# Altium PCB CGM.PcbDoc
Units mil, origin at the board's own origin, x right, y up, seen from the top; angles counter-clockwise.
Board outline 1027.6 x 1027.6 mil, 4 copper layers (Top Layer 1, GND, MID, Bottom Layer 1), stack 17.019 mil thick; 36 components, 37 nets, 136 pads, 54 vias.
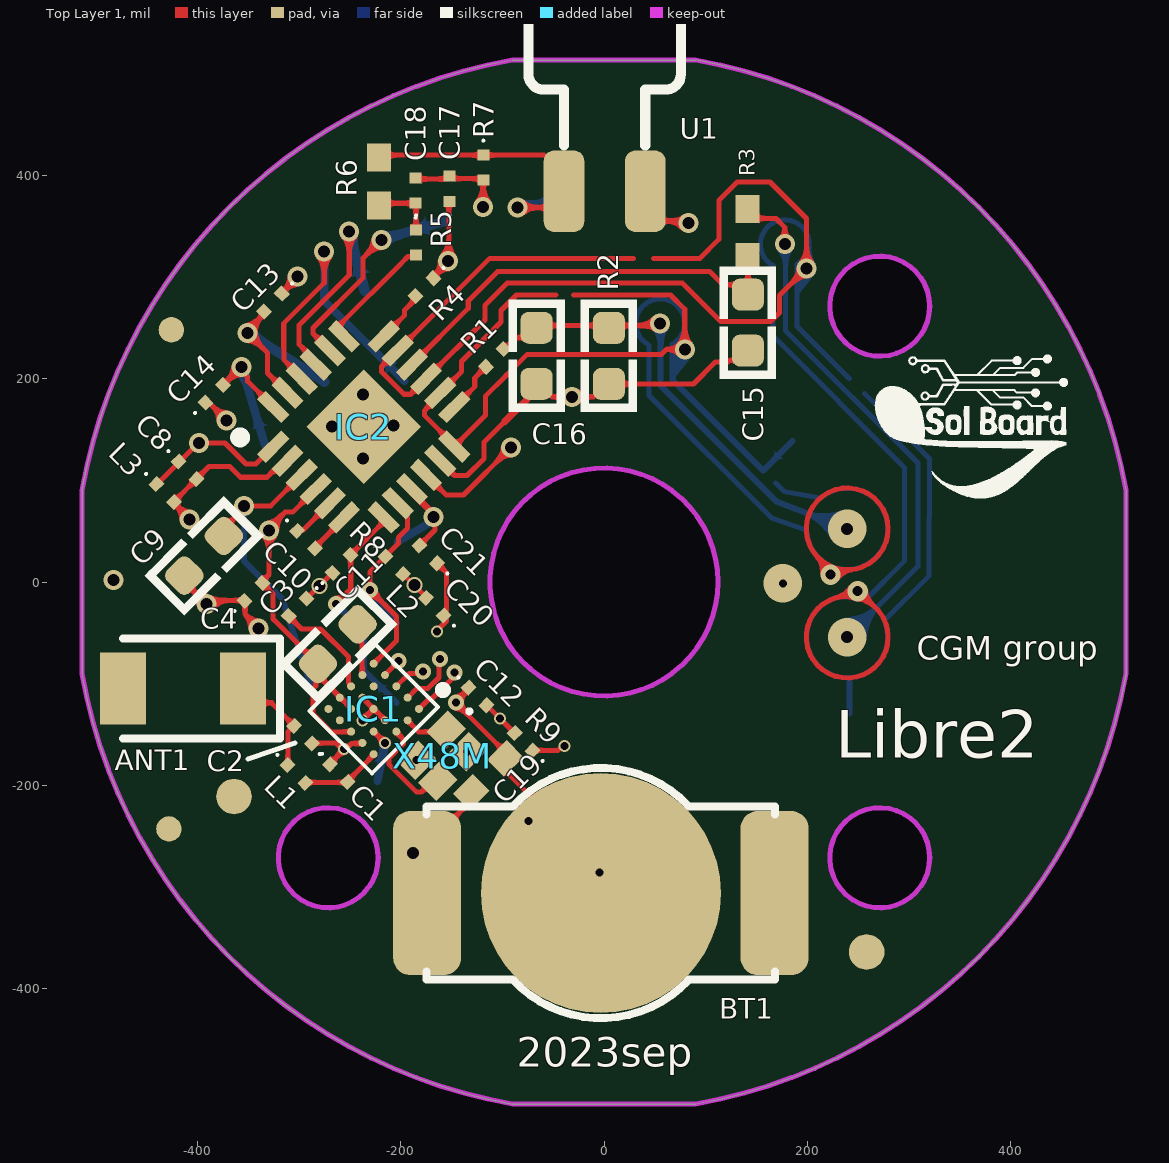
[diagram p0: Top Layer 1 view]
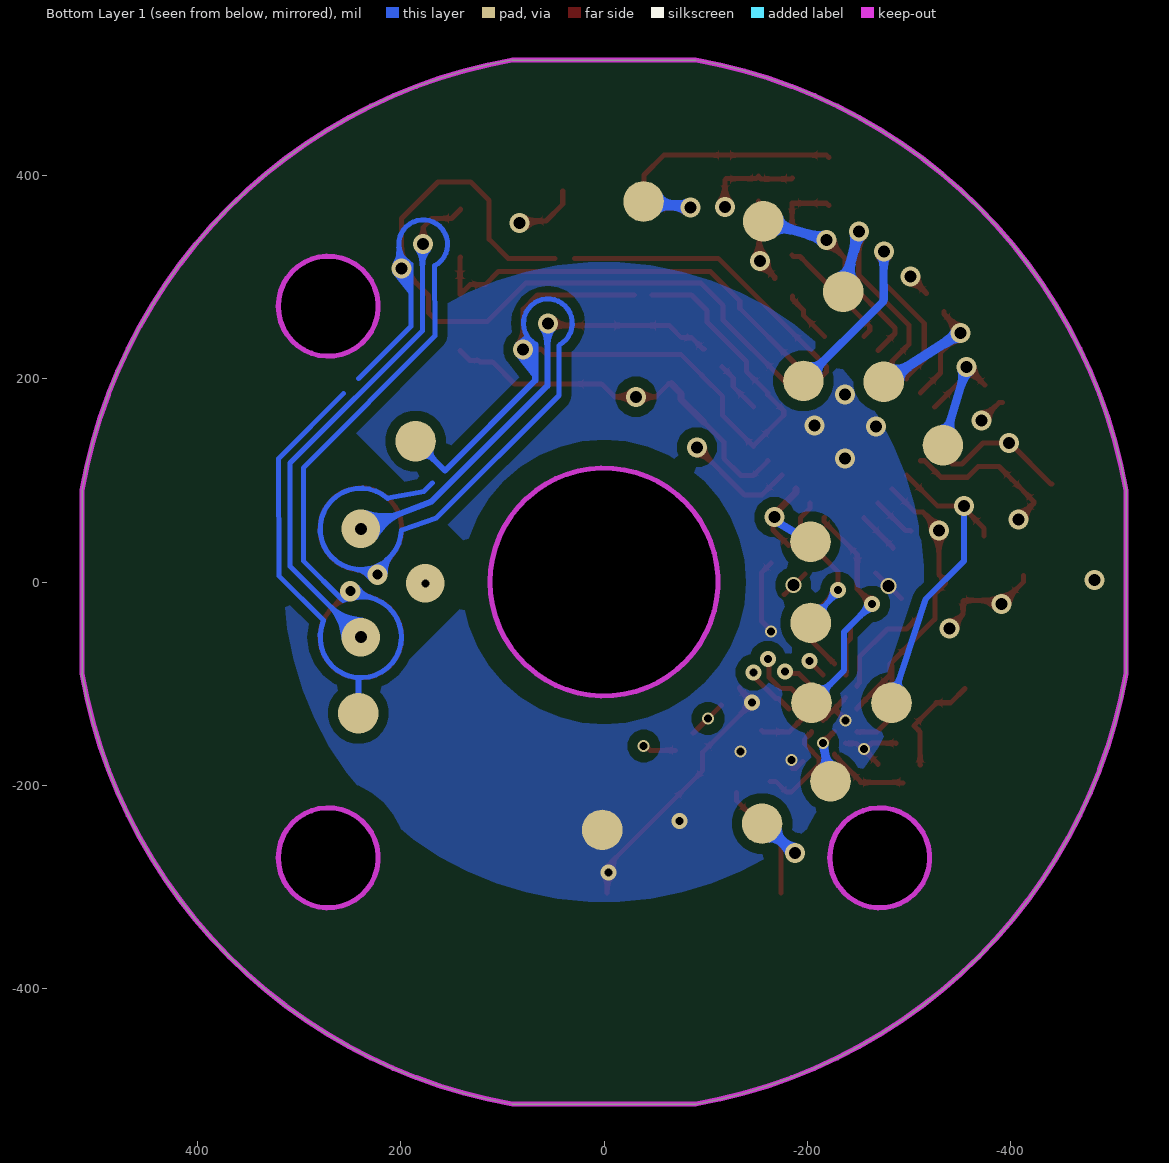
[diagram p1: Bottom Layer 1 view, seen from below]
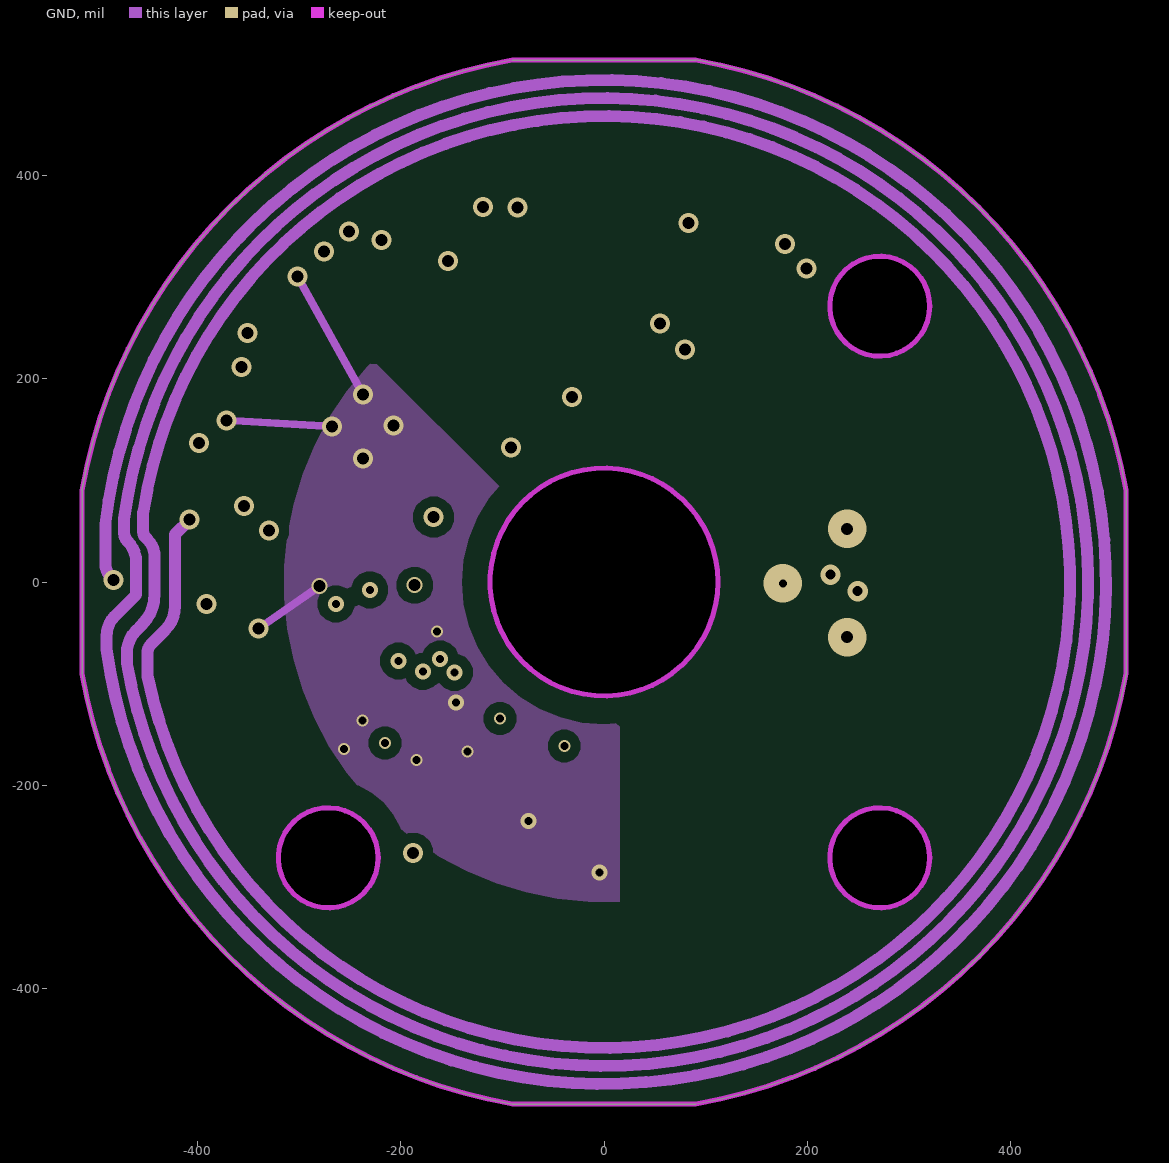
[diagram p2: GND]
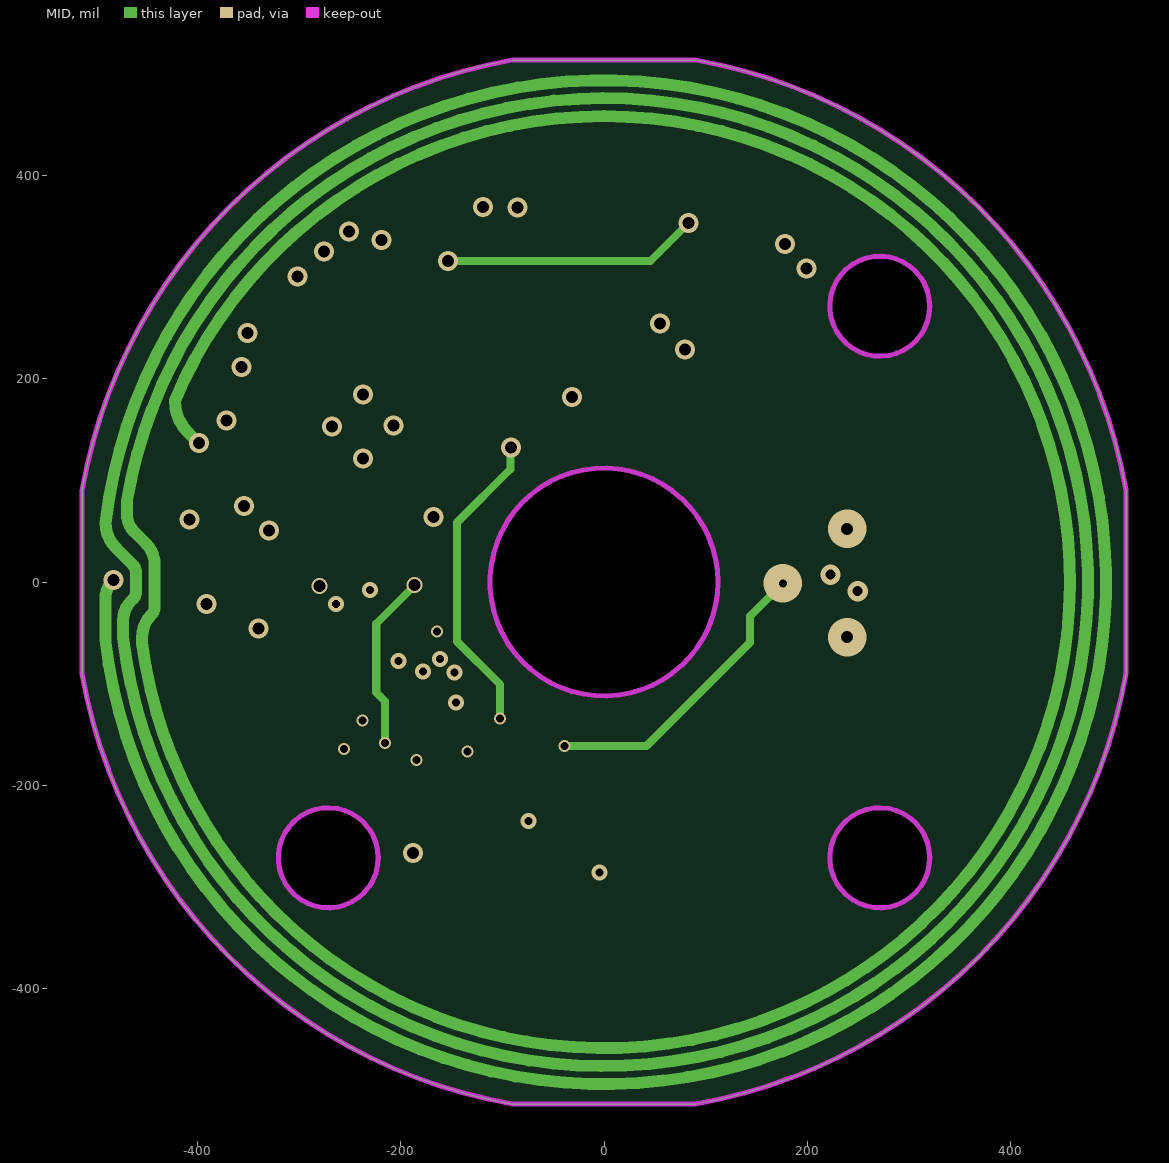
[diagram p3: MID]
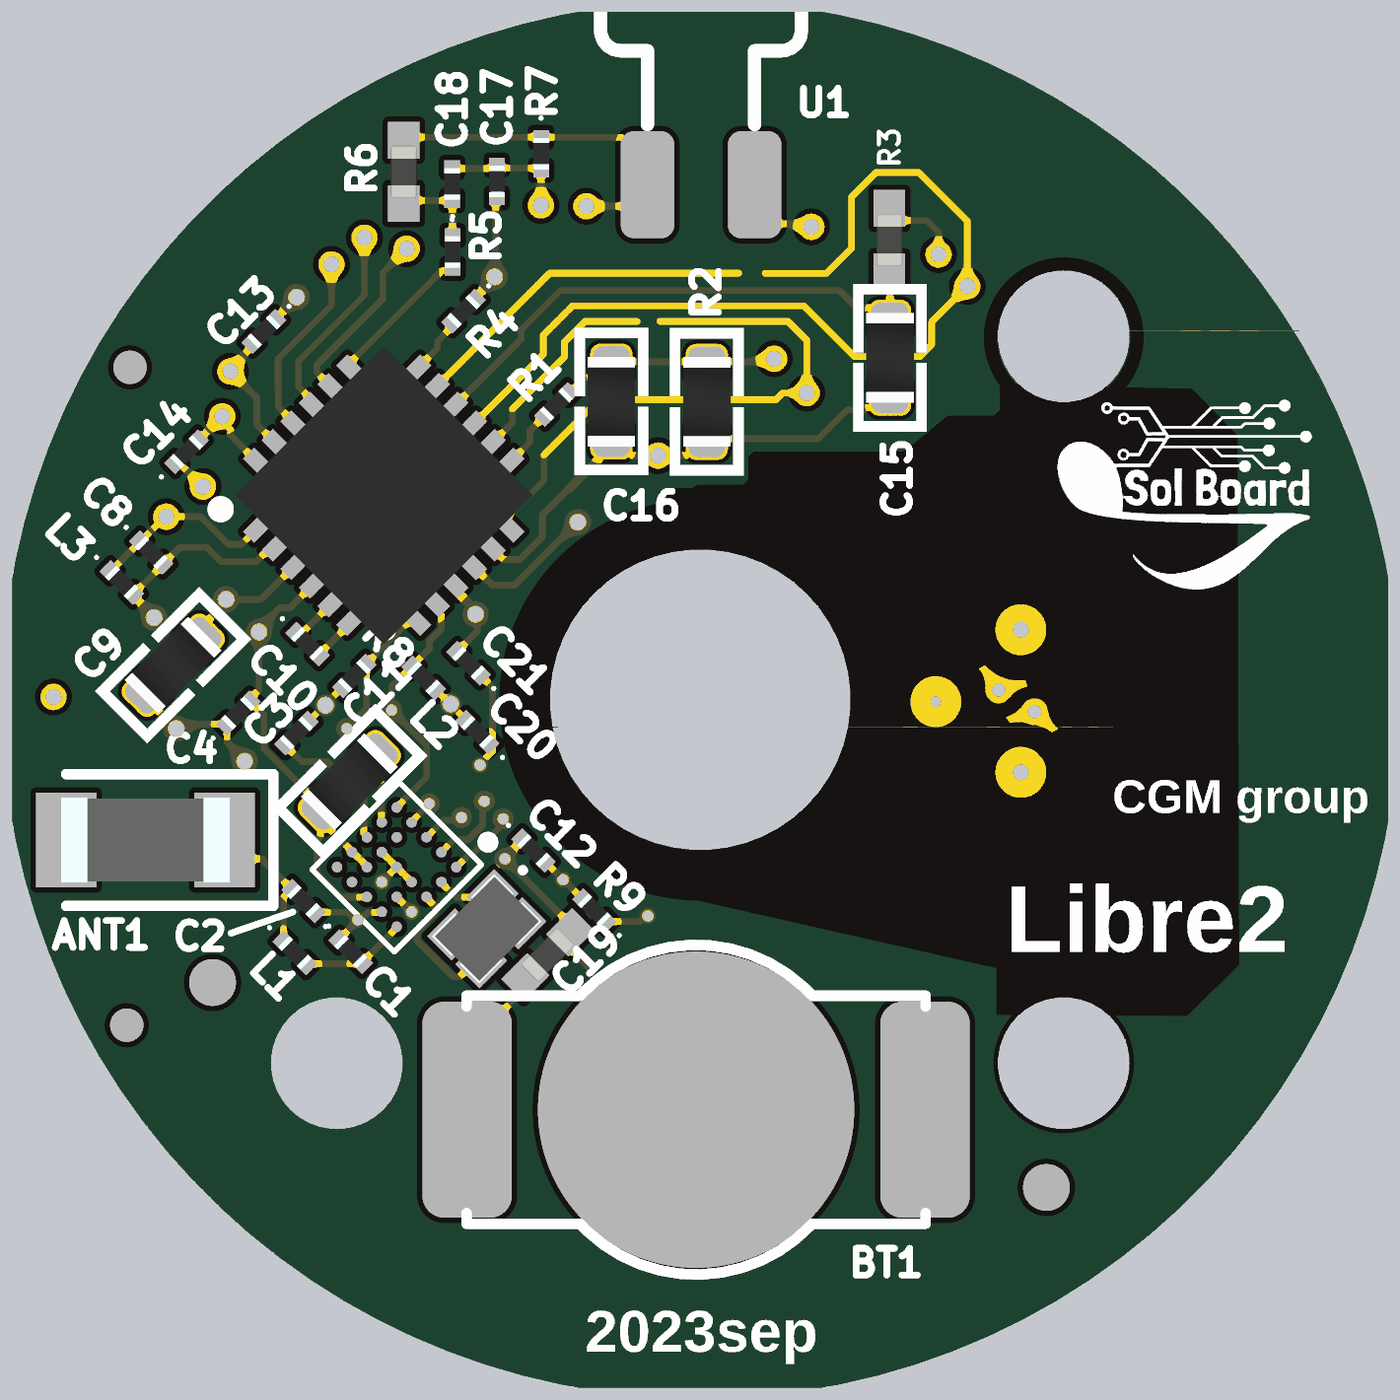
[diagram p4: 3D render of the assembled board from above, using the file's embedded part models]

## Layer stack, top to bottom
Top Solder: solder mask 0.4, Solder Resist, Dk 3.5
Top Layer 1: signal copper 0.689
Dielectric 2: prepreg 2.8, PP-006, Dk 4.1
GND: signal copper 0.689
Dielectric 1: dielectric 8.663, FR-4, Dk 4.8
MID: signal copper 0.689
Dielectric 3: prepreg 2.8, PP-006, Dk 4.1
Bottom Layer 1: signal copper 0.689
Bottom Solder: solder mask 0.4, Solder Resist, Dk 3.5

## Board outline
-513.78,-90.23 -513.78,90.1 -513.8,90.11 cw(c0,0) -90.23,513.78 90.1,513.78 90.11,513.8 cw(c0,0) 513.78,90.23 513.78,-90.1 513.8,-90.11 cw(c0,0) 90.23,-513.78 -90.1,-513.78 -90.11,-513.8 cw(c0,0)
cut-out: -320.64,-271.43 ccw(c-271.43,-271.43) -271.43,-320.64 ccw(c-271.43,-271.43) -222.22,-271.43 ccw(c-271.43,-271.43) -271.43,-222.22 ccw(c-271.43,-271.43)
cut-out: 222.22,-271.43 ccw(c271.43,-271.43) 271.43,-320.64 ccw(c271.43,-271.43) 320.64,-271.43 ccw(c271.43,-271.43) 271.43,-222.22 ccw(c271.43,-271.43)
cut-out: 222.22,271.43 ccw(c271.43,271.43) 271.43,222.22 ccw(c271.43,271.43) 320.64,271.43 ccw(c271.43,271.43) 271.43,320.64 ccw(c271.43,271.43)
cut-out: -112.2,0 ccw(c0,0) 0,-112.2 ccw(c0,0) 112.2,0 ccw(c0,0) 0,112.2 ccw(c0,0)

## Design rules (kind name [scope] priority, off if disabled: settings)
Clearance Clearance_IC2 [All vs InComponent('IC2')] p1: gap=5 ignorepadtopadclearanceinfootprint=FALSE
Clearance Clearance_KEEPOUT [All vs OnLayer('Keep-Out Layer')] p2: gap=25 ignorepadtopadclearanceinfootprint=FALSE
Clearance [All] p3: gap=10 ignorepadtopadclearanceinfootprint=FALSE
PolygonConnect [All] p1: connectstyle=Direct reliefconductorwidth=10 reliefentries=4 polygonreliefangle="90 Angle" airgapwidth=10
RoutingVias [All] p1: holewidth=28 width=50 viastyle="Through Hole" minholewidth=28 minwidth=50 maxholewidth=28 maxwidth=50
SolderMaskExpansion [All] p1: expansion=4 istentingtop=FALSE
SupplyNets "Schematic Supply Nets_1" [InNet('GND')] p1: voltage=0.000
SupplyNets "Schematic Supply Nets" [InNet('VBAT3')] p2: voltage=0.000
Width [All] p1: maxlimit=15 minlimit=3 preferedwidth=5
30 further rules are at their usual default settings.

## Components (designator, comment, footprint, x,y, rotation, side; value= is the part's Value field where it differs from the comment)
ANT1 "AMCA31-2R450G-S1F-T" ANTC3216X140N -414.37,-104.74 r180 top net-tie
BT1 "BAT3.0v" BTH -3.11,-306.14 r0 top
C1 "Cap" 0201 -261.01,-188.17 r315 top value=1.6pF
C2 "Cap" 0201 -296.25,-150.25 r135 top value=1.4pF
C3 "Cap" 0201 -301.56,-24.88 r225 top value=2.2uF
C4 "Cap" 0201 -345.02,-9.8 r45 top value=100nF
C8 "Cap" 0201 -409.92,109.93 r315 top value=8.2pF
C9 "Cap" ESD0603 -393.58,25.82 r225 top value=2.2uF
C10 "Cap" 0201 -293.25,41.65 r315 top value=10nF
C11 "Cap" 0201 -258.34,17.78 r45 top value=100nF
C12 "Cap" 0201 -124.45,-112.61 r315 top value=10nF
C13 "Cap" 0201 -325.88,275.05 r225 top value=100nF
C14 "Cap" 0201 -383.62,185.23 r45 top value=100nF
C15 "Cap" ESD0603 141.69,255.37 r270 top value=?F
C16 "Cap" ESD0603 -66.37,222.66 r270 top value=?F
C17 "Cap" 0201 -151.92,387.04 r90 top value=?F
C18 "Cap" 0201 -185.3,385.12 r90 top value=?F
C19 "Cap" 0402 -113.84,-190.37 r225 top value=100nF
C20 "Cap" 0201 -166.51,-24.25 r135 top value=?nF
C21 "Cap" 0201 -173.04,27.18 r135 top value=?nF
IC1 "EM9304V01CS25B" EM9304V01CS25B -215.12,-113.41 r225 top locked
IC2 "RF430FRL152HCRGER" QFN50P400X400X100-25N-D -236.36,152.74 r45 top locked
L1 "" 0201 -302.73,-188.95 r315 top
L2 "" ESD0603 -262.04,-61.12 r225 top
L3 "" 0201 -431.94,87.56 r315 top
R1 "Res1" 0201 -107.54,220.56 r225 top value=?
R2 "Res1" ESD0603 4.9,222.49 r270 top value=390
R3 "Res1" 0402 141.32,343.27 r270 top value=10k
R4 "Res1" 0201 -176.74,290.25 r225 top value=?
R5 "Res1" 0201 -184.85,334.37 r270 top value=?
R6 "Res1" 0402 -221.44,394.15 r270 top value=?
R7 "Res1" 0201 -118.83,407.76 r270 top value=?
R8 "Res1" 0201 -206.48,16.41 r315 top value=?
R9 "Res1" 0201 -79.16,-157.28 r135 top value=10.5k
U1 "LMT01" "TEMP SENSOR" -39.38,384.62 r0 top
X48M "NX1612SA-48MHZ-EXS00A-CS10127" NX1612SA48MHZEXS00ACS10127 -159.4,-171.11 r225 top

## Footprints (in the part's own frame and the unit in brackets; to place one, negate y for a bottom-side part, rotate by r counter-clockwise, add the part's x,y. Pads: shape width x height; smd on the part's side, far side on the other; paste and mask are expansions set on the pad)
0201 [mm]
  rect 0.275x0.3 smd: 1(-0.313,0) 2(0.313,0)
  silkscreen extent -0.7,-0.03 -0.65,0.03, body extent -0.3,-0.15 0.3,0.15, height 0.23
0402 [mm]
  rect 0.7x0.6 smd: 1(-0.6,0) 2(0.6,0)
  body extent -0.5,-0.25 0.5,0.25, height 0.5
ANTC3216X140N [mm]
  rect 1.15x1.8 smd: 1(-1.5,0) 2(1.5,0)
  silkscreen extent -2.43,-1.25 1.5,1.25, body extent -1.6,-0.8 1.6,0.8, height 1.4
BTH [mm] "BUTTON CELL BATTERY RETAINER 2994"
  rrect50% 1.7x4.1 smd: 1(-4.343,0) 3(4.343,0)
  round 6 smd: 2(0,0)
  silkscreen extent -4.35,-3.12 4.35,3.12, body extent -4,-2.4 4,2.4, height 1.4
EM9304V01CS25B [mm]
  round 0.2 smd: A1(-0.385,0.8) A2(0.015,0.8) A3(0.415,0.8) A5(1.215,0.8) B1(-0.385,0.4) B3(0.415,0.4) B4(0.815,0.4) B5(1.215,0.4) C1(-0.385,0) C3(0.415,0) C5(1.215,0) D1(-0.385,-0.4) D2(0.015,-0.4) D3(0.415,-0.4) D4(0.815,-0.4) D5(1.215,-0.4) E1(-0.385,-0.8) E2(0.015,-0.8) E3(0.415,-0.8) E4(0.815,-0.8) E5(1.215,-0.8)
  silkscreen extent -1.24,-1.1 1.58,1.1
ESD0603 [mm] "CHIP ESD Suppressor 0603ESDA2-TR2, 1.6x0.8mm, 0603"
  rrect50% 0.8x0.8 smd paste-0.05 mask+0.075: 1(-0.7,0) 2(0.7,0)
  silkscreen extent -1.4,-0.7 1.4,0.7, body extent -0.85,-0.45 0.85,0.45, height 0.79
NX1612SA48MHZEXS00ACS10127 [mm]
  rect 0.75x0.65 smd: 1(-0.525,-0.375) 2(0.525,-0.375) 3(0.525,0.375) 4(-0.525,0.375)
  silkscreen extent -1.32,-0.35 -1.22,-0.25, body extent -0.84,-0.63 0.84,0.63, height 0.45
QFN50P400X400X100-25N-D [mm]
  rect 0.85x0.3 smd: 1(-1.95,1.25) 2(-1.95,0.75) 3(-1.95,0.25) 4(-1.95,-0.25) 5(-1.95,-0.75) 6(-1.95,-1.25) 13(1.95,-1.25) 14(1.95,-0.75) 15(1.95,-0.25) 16(1.95,0.25) 17(1.95,0.75) 18(1.95,1.25)
  rect 0.3x0.85 smd: 7(-1.25,-1.95) 8(-0.75,-1.95) 9(-0.25,-1.95) 10(0.25,-1.95) 11(0.75,-1.95) 12(1.25,-1.95) 19(1.25,1.95) 20(0.75,1.95) 21(0.25,1.95) 22(-0.25,1.95) 23(-0.75,1.95) 24(-1.25,1.95)
  rect 2.032x2.032 smd: 25(0,0)
  silkscreen extent -2.5,1.88 -2.25,2.12, body extent -2,-2 2,2, height 1
"TEMP SENSOR" [mil]
  rrect50% 40x80 smd: 1(0,0) 2(80,0)
  silkscreen extent -35,45 115,485

## Part data
ANT1: library part ANT_PCB_2P4G_IFA, "Antenna,Microstrip, 2.4GHz", MANF=MANF, MANF_P#=MANF_P#
BT1: library part BATT_MS518SE, "BATTERY, Lithium, Rechargeable, 6.8mm", .=http://www.chila.ir, MANF=SEIKO, MANF_P#=MS518SE, PARAM="3.4mAH, 10uA charge/discharge", PARAM2="3V, -20~60°C"
C1 C2 C3 C4 C8 C9 C10 C11 C12 C13 C14 C15 C16 C17 C18 C19 C20 C21: "Capacitor", LatestRevisionDate=17-Jul-2002, LatestRevisionNote="Re-released for DXP Platform.", PackageDescription="Radial Cap, Thru-Hole; 2 Leads; 0.3 in Pin Spacing", PackageReference=RAD-0.3, Published=8-Jun-2000, Publisher="Altium Limited"
IC1: "Integrated Circuit", Manufacturer_Name="EM MICROELECTRONIC", Height=0mm, Manufacturer_Part_Number=EM9304V01CS25B
IC2: "Integrated Circuit", Manufacturer_Name="Texas Instruments", Mouser Part Number=595-R430FRL152HCRGER, Arrow Part Number=RF430FRL152HCRGER, Arrow Price/Stock=https://www.arrow.com/en/products/rf430frl152hcrger/texas-instruments?region=nac, Datasheet Link=http://www.ti.com/lit/gpn/rf430frl152h, Height=1mm, Manufacturer_Part_Number=RF430FRL152HCRGER, Mouser Price/Stock=https://www.mouser.co.uk/ProductDetail/Texas-Instruments/RF430FRL152HCRGER?qs=bjKSiFBd6qkz5B9inwiJTw%3D%3D
L1 L2 L3: library part Inductor, "Inductor", Published=8-Jun-2000, Publisher="Altium Limited", Revision="July-2002: Re-released for DXP Platform."
R1 R2 R3 R4 R5 R6 R7 R8 R9: "Resistor", Published=8-Jun-2000, Publisher="Altium Limited", Revision="July-2002: Re-released for DXP Platform."
U1: library part TMP_LMT01_WSON2, "SENSOR, TEMP, DIGITAK, -50~150oC, VCC3~5.5v, Pulse interface", MANF="Texas Instruments", MANF_P#=LMT01LPG, PARAM2=PARAM2
X48M: library part XTL_4_ABM8_114.285M, "CRYSTAL 114.285 MHZ 18PF SMD", ASSEMBLY=ASSEMBLY, DESC=DESCRIPTION, DIST#=MOUSER, MANF=ABRACON, MANF_P#=ABM8-166-114.285MHZ-T, PARAM=20PPM, PARAM2=PARAM, Price=PRICE

## Free pads (board coordinates)
  round 25 smd: 11(-428.24,-243.04) 11(-425.83,248.23)
  round 35 smd: 11(-364.16,-211.16) 11(258.5,-364.19)
  round 40 smd far side: 12(-333.56,134.59) 12(-282.93,-118.98) 12(-275.38,197) 12(-235.36,285.81) 12(-222.96,-196) 12(-204.19,-118.98) 12(-203.44,-40.28) 12(-203.25,39.64) 12(-196.28,197.91) 12(-156.78,355.08) 12(-155.58,-237.77) 12(-38.96,374.53) 12(1.79,-244.01) 12(185.46,138.65) 12(241.76,-129.16)

## Via types
v1: diameter 19.68, hole 11.81, Top Layer 1 to Bottom Layer 1, 16 vias
v2: diameter 19.68, hole 11.81, Top Layer 1 to Bottom Layer 1, tented top, 8 vias
v3: diameter 15.75, hole 7.87, Top Layer 1 to Bottom Layer 1, tented both sides, 7 vias
v4: diameter 19.68, hole 11.81, Top Layer 1 to Bottom Layer 1, tented both sides, 6 vias
v5: diameter 11.81, hole 7.87, Top Layer 1 to Bottom Layer 1, tented both sides, 5 vias
v6: diameter 11.81, hole 7.87, Top Layer 1 to Bottom Layer 1, tented top, 3 vias
v7: diameter 15.75, hole 7.87, Top Layer 1 to Bottom Layer 1, tented top, 2 vias
v8: diameter 38, hole 11.81, Top Layer 1 to Bottom Layer 1, 2 vias
v9: diameter 20, hole 10, Top Layer 1 to Bottom Layer 1, 2 vias
v10: diameter 15.75, hole 11.81, Top Layer 1 to Bottom Layer 1, tented both sides, 2 vias
v11: diameter 38, hole 7.87, Top Layer 1 to Bottom Layer 1, 1 vias

## Nets (pads, with @x,y where several pads share a name; then routed paths per layer and width w, separated by ;. In a path a pad name is that pad's centre, name@x,y a point inside that pad or via, vN(x,y) a via of type N, cw(c..) or ccw(c..) an arc to the next point about the centre after c; other vN are vias at no path point)
EN: C20.2 IC1.B4 pad.12@-222.96,-196 R8.2 | length 257.3
  Top Layer 1 w5: IC1.B4 v5(-215.52,-158.37) ; R8.2 -197.65,7.7 -177.53,-12.42 C20.2@-177.41,-12.42
  MID w8: v5(-215.52,-158.37) -215.52,-117.33 -224.22,-108.63 -224.22,-41.09 v10(-186.31,-3.18)
  Bottom Layer 1 w8: pad.12@-222.96,-196 v5(-215.52,-158.37)
GND: BT1.2 C1.1 C2.1 C3.1 C4.1 C9.2 C11.1 C12.1 C13.1 C14.1 C19.1 C20.1 C21.1 IC1.B3 IC1.B5 IC1.C3 IC1.D3 IC2.25 pad.12@1.79,-244.01 X48M.2 X48M.4 | length 984.6
  Top Layer 1 w5: C9.2 -413.07,0.28 v4(-391.29,-21.5) -387.31,-21.5 -383.97,-18.17 -354.08,-18.17 C4.1 -353.39,-18.86 -353.39,-31.54 -340.23,-44.72 v4(-340.23,-45.93) ; C14.1 -388.92,176.52 -384.93,172.52 -384.69,172.52 v1(-371.37,159.2) ; C13.1 -317.17,284.37 -301.47,300.06 v2(-301.47,300.67) ; C3.1 -292.57,-16.17 -267.33,9.07 C11.1 ; C2.1 -287.19,-158.62 -263.29,-158.62 -257.56,-164.35 v5(-255.72,-164.35) ; C1.1 -269.72,-178.91 -255.72,-164.9 v5(-255.72,-164.35) ; IC1.B5 -238.36,-158.92 -248.44,-158.92 -253.87,-164.35 v5(-255.72,-164.35) ; v6(-237.78,-136.1) IC1.C3 ; IC1.D3 IC1.C3 ; IC1.B3 IC1.C3 ; X48M.2@-195.59,-176.68 -188.73,-183.54 X48M.2@-184.98,-183.54 ; v5(-164.45,-48.69) -164.45,-47.81 -155.06,-38.43 -155.06,9.2 C21.1 ; C12.1 -133.16,-104.98 -145.84,-117.66 v3(-145.84,-118.74) -97.14,-167.44 -97.14,-185.73 -3.11,-279.76 BT1.2
  GND w7.87: v1(-371.37,159.2) v2(-267.74,153) ; v4(-340.23,-45.93) v10(-279.88,-4.01) ; v2(-301.47,300.67) v2(-237.25,184.5)
  other v2: -237.25,121.64 -207.2,153.87
  other v6: -184.45,-175.29 -134.35,-166.93
  other v7: -4.56,-285.76 -74.07,-235.14
NetANT1_1: ANT1.1 C2.2 L1.1 | length 107.7
  Top Layer 1 w5: ANT1.1 -341.2,-118.85 -326.6,-118.85 -326.6,-119.9 C2.2 -305.15,-141.54 -311.1,-147.49 -311.1,-179.88 L1.1
NetC1_2: C1.2 IC1.A5 L1.2 | length 80
  Top Layer 1 w5: L1.2 -289.9,-197.66 -289.47,-197.23 -252.64,-197.23 C1.2 -252.3,-195.91 -226.67,-170.28 IC1.A5
NetC3_2: C3.2 IC1.E3 | length 105.5
  Top Layer 1 w5: C3.2 -297.73,-46.14 -279,-46.14 -251.34,-73.8 -251.34,-99.52 -248.94,-101.92 IC1.E3
NetC9_1: C9.1 IC2.3 pad.12@-282.93,-118.98 | length 322
  Top Layer 1 w5: C9.1 -374.09,52.8 -354.14,72.75 v4(-354.14,74.98) -328.04,74.98 IC2.3
  Bottom Layer 1 w6: v4(-354.14,74.98) -354.14,20.56 -316.41,-17.17 pad.12@-282.93,-118.98
NetC10_1: C10.1 IC2.5 | length 43.5
  Top Layer 1 w5: C10.1 -301.62,50.71 -296.63,50.71 IC2.5
NetC10_2: C10.2 IC2.6 | length 42.6
  Top Layer 1 w5: C10.2 -284.54,33.95 -255.85,62.64 IC2.6
NetC11_2: C11.2 IC2.7 pad.12@-204.19,-118.98 | length 227.3
  Top Layer 1 w5: v3(-263.92,-21.49) -249.28,-6.85 -249.28,26.15 C11.2 -216.72,59.4 -216.72,63.5 IC2.7
  Bottom Layer 1 w6: v3(-263.92,-21.49) -236.39,-49.02 -236.39,-86.78 pad.12@-204.19,-118.98
NetC12_2: C12.2 IC2.10 R9.2 | length 456.9
  Top Layer 1 w5: IC2.10 -155.38,85.68 -138.35,85.68 v4(-91.42,132.61) ; C12.2 -115.43,-121.32 -88.18,-148.57 R9.2
  MID w7.87: v5(-102.47,-134.38) -102.47,-100.67 -144.6,-58.54 -144.6,58.54 -92.18,110.96 -92.18,131.85 v4(-91.42,132.61)
NetC13_2: C13.2 IC2.23 pad.12@-275.38,197 | length 192.7
  Top Layer 1 w5: C13.2 -334.59,263.88 -350.82,247.65 v1(-350.82,245.19) -331.17,225.54 -331.17,205.79 IC2.23
  Bottom Layer 1 w10: v1(-350.82,245.19) pad.12@-275.38,197
NetC14_2: C14.2 IC2.24 pad.12@-333.56,134.59 | length 158.3
  Top Layer 1 w5: C14.2 -374.76,193.94 -357.07,211.64 v1(-356.92,211.64) -356.92,207.94 -350.74,201.76 -350.74,197.52 IC2.24
  Bottom Layer 1 w8: v1(-356.92,211.64) pad.12@-333.56,134.59
NetC15_1: C15.1 IC2.16 R3.2 | length 419.1
  Top Layer 1 w5: IC2.16 -133.61,269.41 -133.61,276.58 -104.57,305.62 104.02,305.62 116.97,292.67 131.95,292.67 C15.1 141.69,319.28 R3.2
NetC15_2: C15.2 C16.2 IC2.11 R2.2 | length 380.8
  Top Layer 1 w5: IC2.11 -161.2,118.96 -146.97,104.73 -134.86,104.73 -117.94,121.65 -117.94,137.75 -98.26,157.43 ; C16.2@-63.74,195.1 -50.96,182.33 v1(-31.5,182.33) -10.34,182.33 2.26,194.93 R2.2 88.08,194.93 109.6,216.45 121.92,216.45 123.55,218.08 131.95,218.08 C15.2
  Top Layer 1 w7: -98.1,157.43 -75.92,179.6 -75.92,185.55 C16.2
NetC17_1: C17.1 R4.1 U1.2 | length 397.3
  Top Layer 1 w5: R4.1 -168.02,300.15 -153.59,314.58 v2(-153.59,315.76) -152.76,316.59 -152.76,373.89 C17.1 ; U1.2 40.62,371.86 57.09,355.4 80.74,355.4 v1(82.96,353.17)
  MID w7.87: v2(-153.59,315.76) 45.55,315.76 v1(82.96,353.17)
NetC17_2: C17.2 C18.2 R7.2 | length 95.8
  Top Layer 1 w5: C18.2 -184.54,396.67 -154.61,396.67 C17.2 -149.51,396.95 -120.35,396.95 -118.9,395.5 -118.9,369.26 v1(-118.96,369.2)
NetC18_1: C18.1 R5.1 R6.2 | length 63.4
  Top Layer 1 w5: R6.2 -219.17,372.79 C18.1 -185.08,372.57 -185.08,346.92 R5.1
NetC21_2: C21.2 IC2.9 pad.12@-203.25,39.64 | length 117.6
  Top Layer 1 w5: C21.2 -166.39,51.26 -166.39,62.46 v4(-167.78,63.86)
  Top Layer 1 w7: IC2.9 -189.04,88.3 -167.78,67.05 v4(-167.78,63.86)
  Bottom Layer 1 w8: pad.12@-203.25,39.64 -165.98,61.63 -167.78,63.43 v4(-167.78,63.86)
NetIC2_12: IC2.12 IC2.14 pad.12@185.46,138.65 | length 1772.6
  Top Layer 1 w5: -47.15,282.5 -86.13,282.5 -101.45,267.18 -101.45,255.95 -140.28,217.12 -140.28,207.06 IC2.14 -161.2,184.34 -176.88,168.65 -176.88,164.06 -147.28,134.46 IC2.12 -116.76,163.77 -116.76,182.73 -96.18,203.31 -96.18,203.5 -75.59,224.08 56.53,224.08 61.47,229.02 v1(79.49,229.02) 79.49,268.55 65.47,282.57 -30.17,282.57 ; 279.69,52.29 ccw(c239.41,52.29) 279.69,52.29
  Bottom Layer 1 w5: 43.91,233.47 cw(c55.21,254.64) 67.08,233.78 ; 44.37,232.97 44.37,183.59 165.03,62.93 198.89,51.26 ; 168.71,97.62 177.08,89.25 212.7,82.45 ; 199.42,51.27 ccw(c239.41,52.29) 212.89,82.24
  Bottom Layer 1 w6: 67.71,233.78 67.71,198.52 156.52,109.71 pad.12@185.46,138.65
  other v9: 222.85,7.29
NetIC2_15: IC2.15 IC2.17 pad.12@241.76,-129.16 | length 2530.6
  Top Layer 1 w5: 28.8,318.53 -112.33,318.53 IC2.17 -203.14,227.9 -218.85,212.19 -218.85,206.76 -196.87,184.78 -190.41,184.78 IC2.15 -117.23,257.95 -117.23,272.33 -95.39,294.17 77.23,294.17 115.14,256.26 164,256.26 172.79,265.05 172.79,282.16 v1(199.4,308.77) 199.4,357.67 163.39,393.68 131.2,393.68 113.03,375.51 113.03,337.25 94.24,318.46 48.51,318.46 ; 279.68,-54.23 ccw(c239.4,-54.23) 279.68,-54.23
  Bottom Layer 1 w5: 166.34,311.49 cw(c177.97,332.48) 190.02,311.73 ; 166.67,311.31 166.52,242.17 295.78,112.33 295.58,20.47 257.78,-17.15 256.96,-17.97 ; 189.97,311.7 ccw(c177.97,332.48) 190.02,311.73 ; 190.02,311.78 190.02,311.73 ; 241.7,200.13 190.15,251.44 190.02,308.75 190.02,311.73 ; 256.21,185.67 320.3,121.29 320.04,6.13 276.36,-37.36 ; 256.83,-18.23 ccw(c239.4,-54.23) 275.94,-37.96
  Bottom Layer 1 w6: pad.12@241.76,-129.16 241.76,-94.48
  other v9: 249.63,-8.97
NetR1_2: IC2.13 R1.2 | length 52.5
  Top Layer 1 w5: IC2.13 -127.23,192.28 -127.23,200.87 R1.2
NetR4_2: IC2.18 R4.2 | length 52.7
  Top Layer 1 w5: IC2.18 -196.2,262.5 -196.2,267.72 -185.45,278.47 R4.2
NetR6_1: pad.12@-38.96,374.53 R6.1 R7.1 U1.1 | length 305.9
  Top Layer 1 w5: R6.1 -219.13,420.08 R7.1 -58.9,420.08 -39.38,400.56 U1.1 -55.48,368.52 v1(-85.07,368.52)
  Bottom Layer 1 w10: v1(-85.07,368.52) pad.12@-38.96,374.53
"NFC ANT1": C8.1 C8.2 IC2.1 IC2.2 L3.1 L3.2 | length 18264.7
  Top Layer 1 w5: L3.1 -439.93,96.28 -399.49,136.71 v1(-398.76,136.71) -373.14,136.71 -352.47,116.04 -342.66,116.04 IC2.1 ; v2(-407.86,61.31) -407.86,62.4 -423.23,77.77 L3.2 -423.23,79.02 -401.21,101.05 C8.2 -388.71,113.71 -368.37,113.71 -357.77,103.11 -331.7,103.11 -315.47,119.33 IC2.2
  GND w11.81: v1(-482.95,2.09) -484.88,4.02 cw(c-470.44,18.46) -490.86,18.46 -490.86,56.44 cw(c0,0) -489.66,-66.06 -489.66,-53.22 cw(c-461.9,-53.22) -481.53,-33.59 -460.43,-12.49 -460.43,19.3 ccw(c-490.25,19.3) -469.17,40.39 cw(c-461.67,47.89) -472.27,47.89 -472.27,62.4 cw(c0,0) -469.71,-79.43 -469.71,-70.14 cw(c-438.24,-70.14) -460.49,-47.88 -454.9,-42.29 ccw(c-485.48,-11.7) -442.23,-11.7 -442.23,24.88 ccw(c-466.31,24.88) -449.27,41.9 ; -449.28,41.91 -451.26,43.89 cw(c-445.75,49.4) -453.54,49.4 -453.54,68.35 cw(c0,0) -449.27,-92.36 -449.27,-70.05 cw(c-436.03,-70.05) -445.39,-60.69 -432.09,-47.39 ccw(c-455.86,-23.62) -422.24,-23.62 -422.24,46.93 v2(-407.86,61.31)
  MID w11.81: v1@-482.95,2.09 ccw(c-463.85,-17.01) -490.86,-17.01 -490.86,-17.22 -490.86,-56.61 ccw(c0,-0.17) -490.63,58.22 ccw(c-456,58.22) -480.49,33.73 -464.18,17.42 cw(c-473.22,8.38) -460.43,8.38 -460.43,-8.76 cw(c-472.1,-8.76) -463.85,-17.01 -465.28,-18.44 ccw(c-446.02,-37.7) -473.26,-37.7 -473.26,-54.58 ccw(c0,-0.17) -469.71,79.26 -469.71,67.33 ccw(c-444.28,67.33) -462.26,49.35 -450.96,38.05 cw(c-472.06,16.96) -442.23,16.96 -442.23,-24.59 cw(c-452.75,-24.59) -445.31,-32.03 ccw(c-422.67,-54.67) -454.69,-54.67 -454.69,-60.4 ccw(c0,-0.17) -422.43,178.5 ccw(c-378.68,178.5) -409.61,147.56 v1(-398.76,136.71)
SCSN: IC1.E1 IC2.8 pad.12@-203.44,-40.28 R8.1 | length 239.9
  Top Layer 1 w5: IC1.E1 -226.67,-80.27 -204.26,-57.86 -204.26,-33.99 v3(-230.52,-7.73) -230.52,9.8 -202.26,38.06 -202.26,44.01 -193.37,52.89 -193.37,63.17 -202.96,72.76 IC2.8
  Bottom Layer 1 w5: v3(-230.52,-7.73) pad.12@-203.44,-40.28
sen1(RE): R9.1 | length 329.7
  Top Layer 1 w5: R9.1 -70.1,-165.65 -45.17,-165.65 -40.94,-161.42 v5(-39.1,-161.42)
  MID w7.87: v5(-39.1,-161.42) 41.72,-161.42 143.64,-59.5 143.64,-33.7 v11(175.93,-1.41)
sen2(CE): R3.1 | length 530.6
  Top Layer 1 w5: R3.1 141.32,366.69 150.13,357.88 169.19,357.88 177.97,349.1 v1(177.97,332.48)
  Bottom Layer 1 w5: v1(177.97,332.48) 178.74,331.72 178.74,247.27 308.97,117.04 308.97,94.82 308.88,94.73 308.88,15.25 v8(239.4,-54.23)
sen3(WE): C16.1 R1.1 R2.1 | length 462.1
  Top Layer 1 w5: R1.1 -97.49,229.28 -86.28,240.48 -76.11,240.48 C16.1 -64.16,252.43 53,252.43 v1(55.21,254.64)
  Bottom Layer 1 w6: v1(55.21,254.64) 55.79,254.06 55.79,193.15 169.6,79.34 v8(239.41,52.29)
SW-DCDC: IC1.E2 L2.1 | length 51.9
  Top Layer 1 w5: L2.1 -242.55,-55.67 -238.11,-60.12 -238.11,-91.26 IC1.E2
TCK: IC2.22 pad.12@-196.28,197.91 | length 308.7
  Top Layer 1 w5: IC2.22 -297.61,201.17 -315.17,218.73 -315.17,230.69 -315.21,230.73 -315.21,254.62 -275.39,294.44 v1(-275.39,325.12)
  Bottom Layer 1 w8: v1(-275.39,325.12) -275.24,307.83 ; -275.24,307.78 -275.29,278.68 ccw(c-270.29,278.65) -273.83,275.13 ; -273.81,275.11 pad.12@-196.28,197.91
TDI: IC2.21 pad.12@-235.36,285.81 | length 219.5
  Top Layer 1 w5: IC2.21 -283.69,217.57 -300.09,233.98 -300.09,252.77 -250.76,302.1 v1(-250.76,345.03)
  Bottom Layer 1 w10: v1(-250.76,345.03) pad.12@-235.36,285.81
TDO: IC2.20 pad.12@-156.78,355.08 | length 208.7
  Top Layer 1 w5: IC2.20 -286.44,244.58 -286.44,249.91 -237.01,299.34 -237.01,318.99 v1(-219.22,336.78)
  Bottom Layer 1 w10: v1(-219.22,336.78) pad.12@-156.78,355.08
TMS: IC2.19 R5.2 | length 118.1
  Top Layer 1 w5: IC2.19 -261.52,247.5 -261.52,251.61 -199.17,313.96 -199.17,314.18 -192.99,320.36 -186.54,320.36 R5.2
VBAT2: C4.2 IC1.C5 IC1.D4 IC1.E4 IC2.4 L2.2 | length 374.9
  Top Layer 1 w5: IC2.4 -306.42,68.76 -314.09,68.76 -329.53,53.32 v2(-329.53,50.61) -329.53,7.49 -336.31,0.71 C4.2 -325.78,-11.62 -325.78,-36.35 -322.89,-39.24 L2.2 ; IC1.C5 -249.24,-147.54 -268.5,-147.54 -286.36,-129.68 -286.36,-104.96 -283.58,-102.18 -283.58,-82.66 L2.2 ; IC1.D4 -248.94,-124.19 -281.53,-91.6 L2.2
VBAT3: BT1.1 C19.2 pad.12@-155.58,-237.77 | length 161.4
  Top Layer 1 w5: BT1.1 -174.09,-258.9 -130.54,-215.34 C19.2
  Bottom Layer 1 w5: v4(-187.93,-266.49) v4@-186.11,-266.49 ; pad.12@-157.4,-237.77 pad.12@-155.58,-237.77
  Bottom Layer 1 w10: v4@-186.11,-266.49 pad.12@-157.4,-237.77
XIN: IC1.A3 X48M.3 | length 104.6
  Top Layer 1 w5: IC1.A3 -204.4,-148.01 -197.6,-154.81 -197.6,-159.41 -205.03,-166.84 -205.03,-167.16 -211.44,-173.57 -211.44,-179.78 -184.41,-206.82 -179.62,-206.82 -168.97,-196.16 X48M.3
XOUT: IC1.A2 X48M.1 | length 43.6
  Top Layer 1 w5: IC1.A2 -193.27,-136.62 -182.44,-147.45 -156.62,-147.45 X48M.1
pads on no net: ANT1.2 BT1.3 IC1.A1 IC1.B1 IC1.C1 IC1.D1 IC1.D2 IC1.D5 IC1.E5
copper on no net: | length 161.3
  Top Layer 1 w5: -215.54,-91.56 -215.54,-91.22 -202.34,-78.03 v3(-202.34,-77.69) ; -204.4,-102.69 -191.72,-90.01 -180.38,-90.01 v3(-178.33,-87.95) ; -193.27,-113.83 -184.14,-104.7 -173.33,-104.7 -162.52,-93.88 -162.52,-76.98 v3(-161.28,-75.75) ; -182.13,-124.96 -171.87,-114.7 -169.19,-114.7 -149.2,-94.71 -149.2,-90.98 v3(-147.14,-88.92)

## Polygon pours and split planes (outlines as drawn)
GND on Bottom Layer 1 "GND_L04_P001" (solid, remove dead copper, pour order 1): -314.62,0 ccw(c0,0) 0,-314.62 ccw(c0,0) 314.62,0 ccw(c0,0) 0,314.62 ccw(c0,0)
GND on GND "GND_L02_P000" (solid, remove dead copper, pour order 0): -314.62,0 ccw(c0,0) 0,-314.62 ccw(c0,0) 314.62,0 ccw(c0,0) 0,314.62 ccw(c0,0)

## Keep-outs
Keep-Out Layer:
  circle w5: c271.43,-271.43 r49.21
  circle w5: c271.43,271.43 r49.21
  circle w5: c-271.43,-271.43 r49.21
  circle w5: c0,0 r112.2
  lines w5: -513.78,-90.23 ccw(c0,0) -90.11,-513.8 90.23,-513.78 ccw(c0,0) 513.8,-90.11 513.78,90.23 ccw(c0,0) 90.11,513.8 -90.23,513.78 ccw(c0,0) -513.8,90.11 -513.78,-90.23

## Other copper
GND:
  pour cut-out: 15.35,-322.56 162.13,-322.56 162.13,-108.24 15.37,-108.24 15.37,-322.45
  pour cut-out: -74.76,65.75 29.93,170.45 -121.61,321.99 -226.31,217.3
Bottom Layer 1:
  pour cut-out: 264.81,167.57 133.18,35.94 133.18,-17.97 216.16,-100.95
  region net NetIC2_15: 207.18,314.86 197.8,322.25 187.62,313.53 187.62,278.27 208.34,304.26
  region net NetIC2_12: 87.27,235.11 77.89,242.5 67.71,233.78 67.71,198.52 88.43,224.51

## Silkscreen, mask and mechanical layers (free items; w line width, h text height)
Top Overlay:
  drawing of 391 lines, arcs and shapes, not listed
  text "CGM group" at 307.78,-84.47 h40
  text "Libre2" at 227.74,-188.12 h80
  text "2023sep" at -86.12,-486.83 h50
  text "Layer" at -1213.12,-652.44 h35.57
  text "Name" at -961.94,-652.44 h35.57
  text "Material" at -402.56,-652.44 h35.57
  text "Thickness" at 115.34,-652.44 h35.57
  text "Constant" at 508.76,-652.44 h35.57
  text "Board Layer Stack" at 854.77,-652.44 h35.57
  text "Top Overlay" at -961.94,-723.59 h35.57
  text "Top Solder" at -961.94,-794.74 h35.57
  text "Solder Resist" at -402.56,-794.74 h35.57
  text "0,010mm" at 115.34,-794.74 h35.57
  text "3.5" at 508.76,-794.74 h35.57
  text "1" at -1213.12,-865.89 h35.57
  text "Top Layer 1" at -961.94,-865.89 h35.57
  text "CF-004" at -402.56,-865.89 h35.57
  text "0,018mm" at 115.34,-865.89 h35.57
  text "Dielectric 2" at -961.94,-937.03 h35.57
  text "PP-006" at -402.56,-937.03 h35.57
  text "0,071mm" at 115.34,-937.03 h35.57
  text "4.1" at 508.76,-937.03 h35.57
  text "2" at -1213.12,-1008.18 h35.57
  text "GND" at -961.94,-1008.18 h35.57
  text "0,018mm" at 115.34,-1008.18 h35.57
  text "Dielectric 1" at -961.94,-1079.33 h35.57
  text "FR-4" at -402.56,-1079.33 h35.57
  text "0,220mm" at 115.34,-1079.33 h35.57
  text "4.8" at 508.76,-1079.33 h35.57
  text "3" at -1213.12,-1150.48 h35.57
  text "MID" at -961.94,-1150.48 h35.57
  text "0,018mm" at 115.34,-1150.48 h35.57
  text "Dielectric 3" at -961.94,-1221.62 h35.57
  text "PP-006" at -402.56,-1221.62 h35.57
  text "0,071mm" at 115.34,-1221.62 h35.57
  text "4.1" at 508.76,-1221.62 h35.57
  text "4" at -1213.12,-1292.77 h35.57
  text "Bottom Layer 1" at -961.94,-1292.77 h35.57
  text "CF-004" at -402.56,-1292.77 h35.57
  text "0,018mm" at 115.34,-1292.77 h35.57
  text "Bottom Solder" at -961.94,-1363.92 h35.57
  text "Solder Resist" at -402.56,-1363.92 h35.57
  text "0,010mm" at 115.34,-1363.92 h35.57
  text "3.5" at 508.76,-1363.92 h35.57
  text "Bottom Overlay" at -961.94,-1435.07 h35.57
  text "Total board thickness:" at -1213.12,-1506.21 h35.57
  text "0,453mm" at 115.34,-1506.21 h35.57
  text "ALI RAHIMZADEH 09123446320" at 805.69,-1518.85 h50
Top Solder:
  circle w10: c271.44,270.64 r54.72
  circle w40: c0,0 r130.02
  circle w5: c271.46,-271.2 r50
  region: -29.02,-143.9 221.17,-200.48 221.17,-235.38 363.36,-236.27 402.45,-197.93 401.34,197.29 367.41,232.26 312.63,233.45 223.59,236.29 223.59,216.32 219.66,212.38 186.44,212.38 183.93,211.48 153.66,186.4 151.15,185.49 39.76,185.49 35.82,181.55 35.82,164.49 31.89,160.55 -2.08,160.55 -5.58,158.17 -18.18,158.17 -35.01,142.57
Mechanical 1:
  drawing of 2044 lines, arcs and shapes, not listed
  text "2.486791850830025" at -3503.91,-1498.17 h4.72
  text ".1400" at 1115.15,-1514.62 h4.72
  text ".2804" at 1035.24,-1518.55 h4.72
  text "0.588" at -3553.1,-1532.14 h4.72
  text ".2950" at 1011.35,-1535.39 h4.72
Mechanical 2:
  drawing of 242 lines, arcs and shapes, not listed
  text "(∅26.500)" at -1862.7,-1061.23 h4.72
  text "100%" at -1828.9,-1061.23 h4.72
  text "∅26.4998" at -138.2,-1597.23 h4.72
Mechanical 3:
  drawing of 302 lines, arcs and shapes, not listed
  text ".1400" at -6.53,-464.07 h4.72
  text ".2804" at -86.44,-468 h4.72
  text ".2950" at -110.33,-484.84 h4.72